# Altium PCB DC-DC_30KW_BUCK-BOOST.PcbDoc (part 1 of 2)
Units mm, origin at the board's own origin, x right, y up, seen from the top; angles counter-clockwise.
Board outline 250 x 400 mm, 4 copper layers (Top Layer 1, Top Layer, Bottom Layer, Bottom Layer 1), stack 0.603 mm thick; 286 components, 138 nets, 777 pads, 13 vias.
Unrouted connection lines stored in the file: 310.
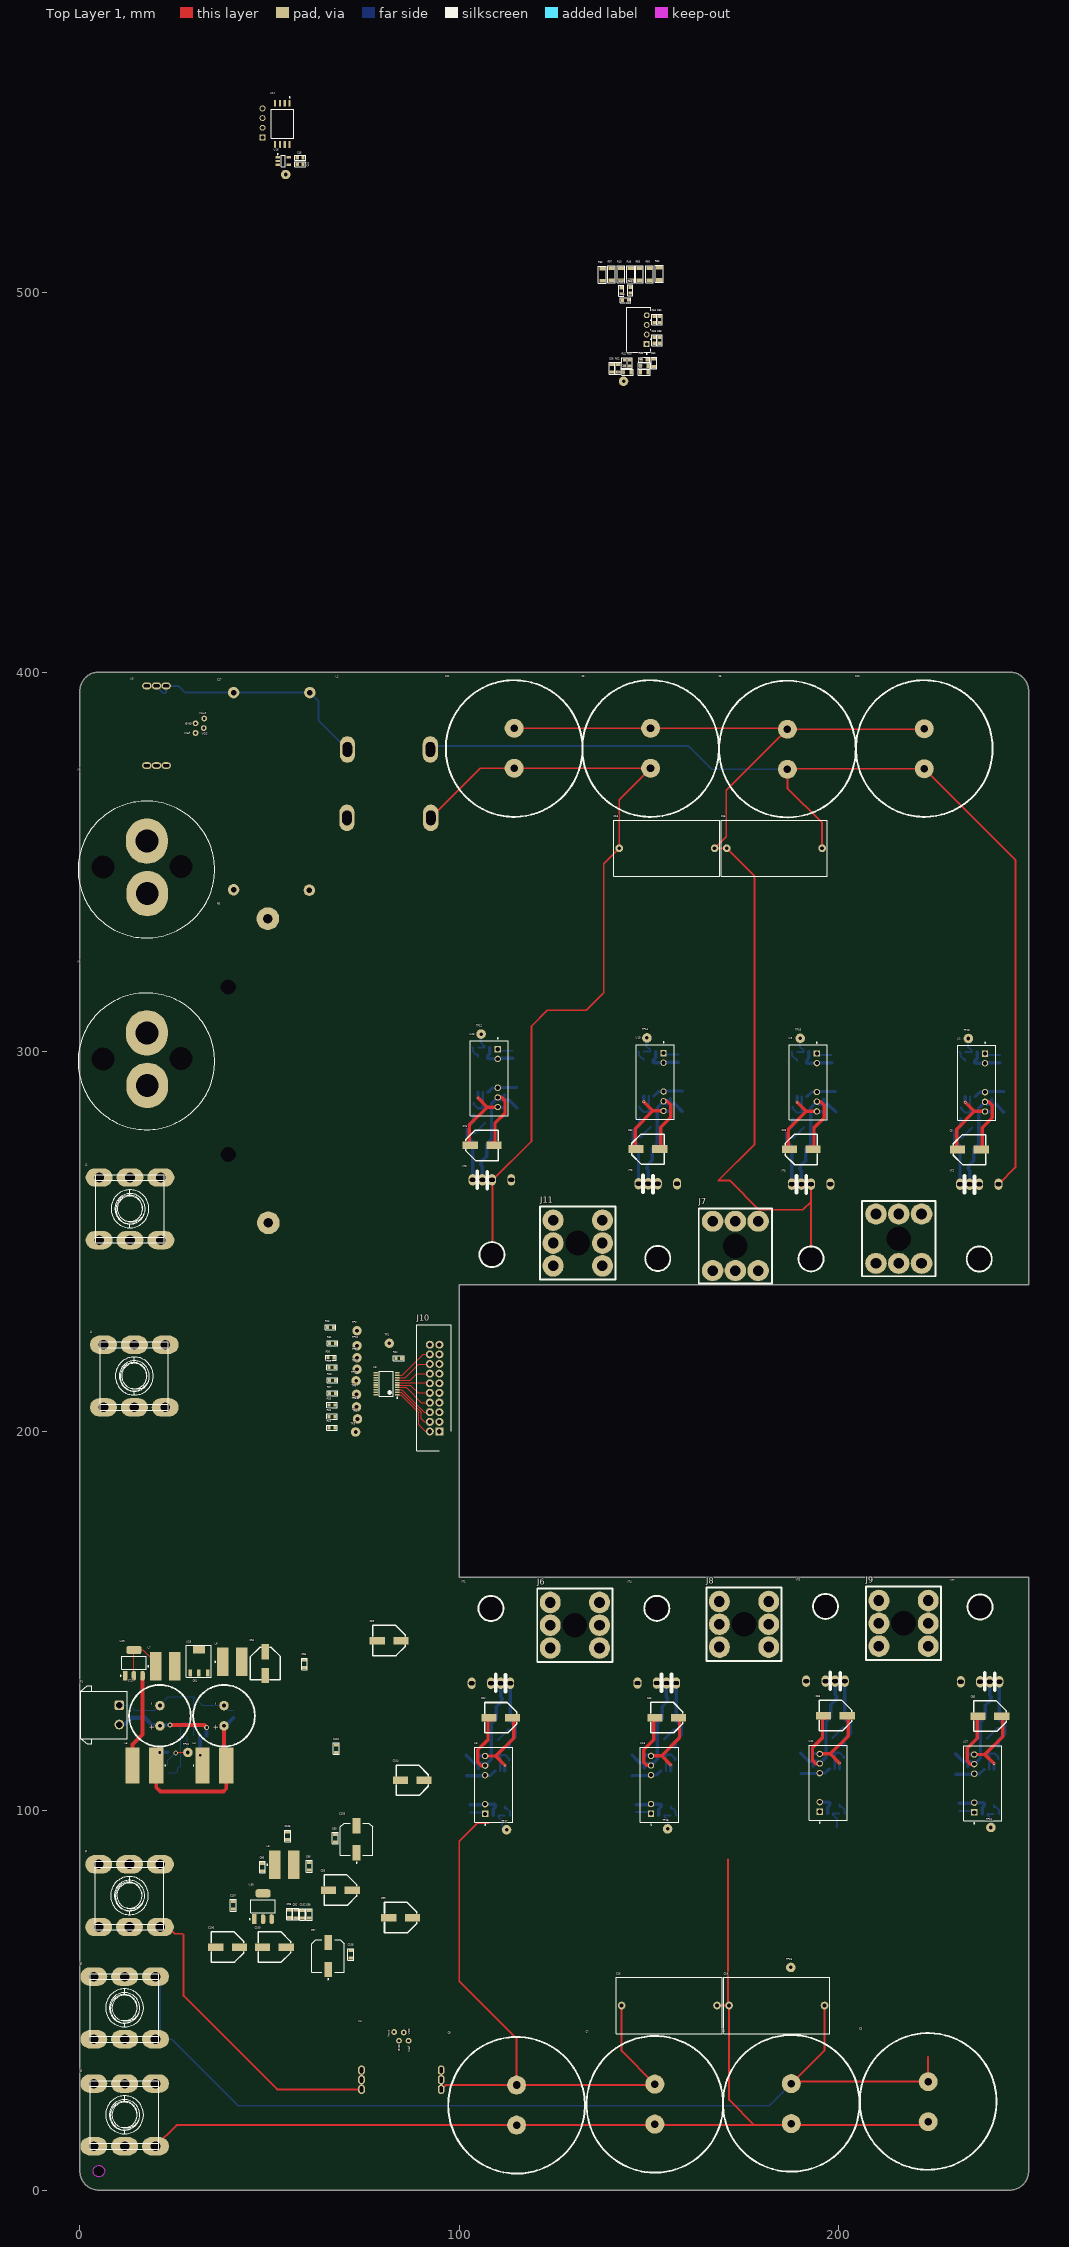
[diagram p0: Top Layer 1 view]
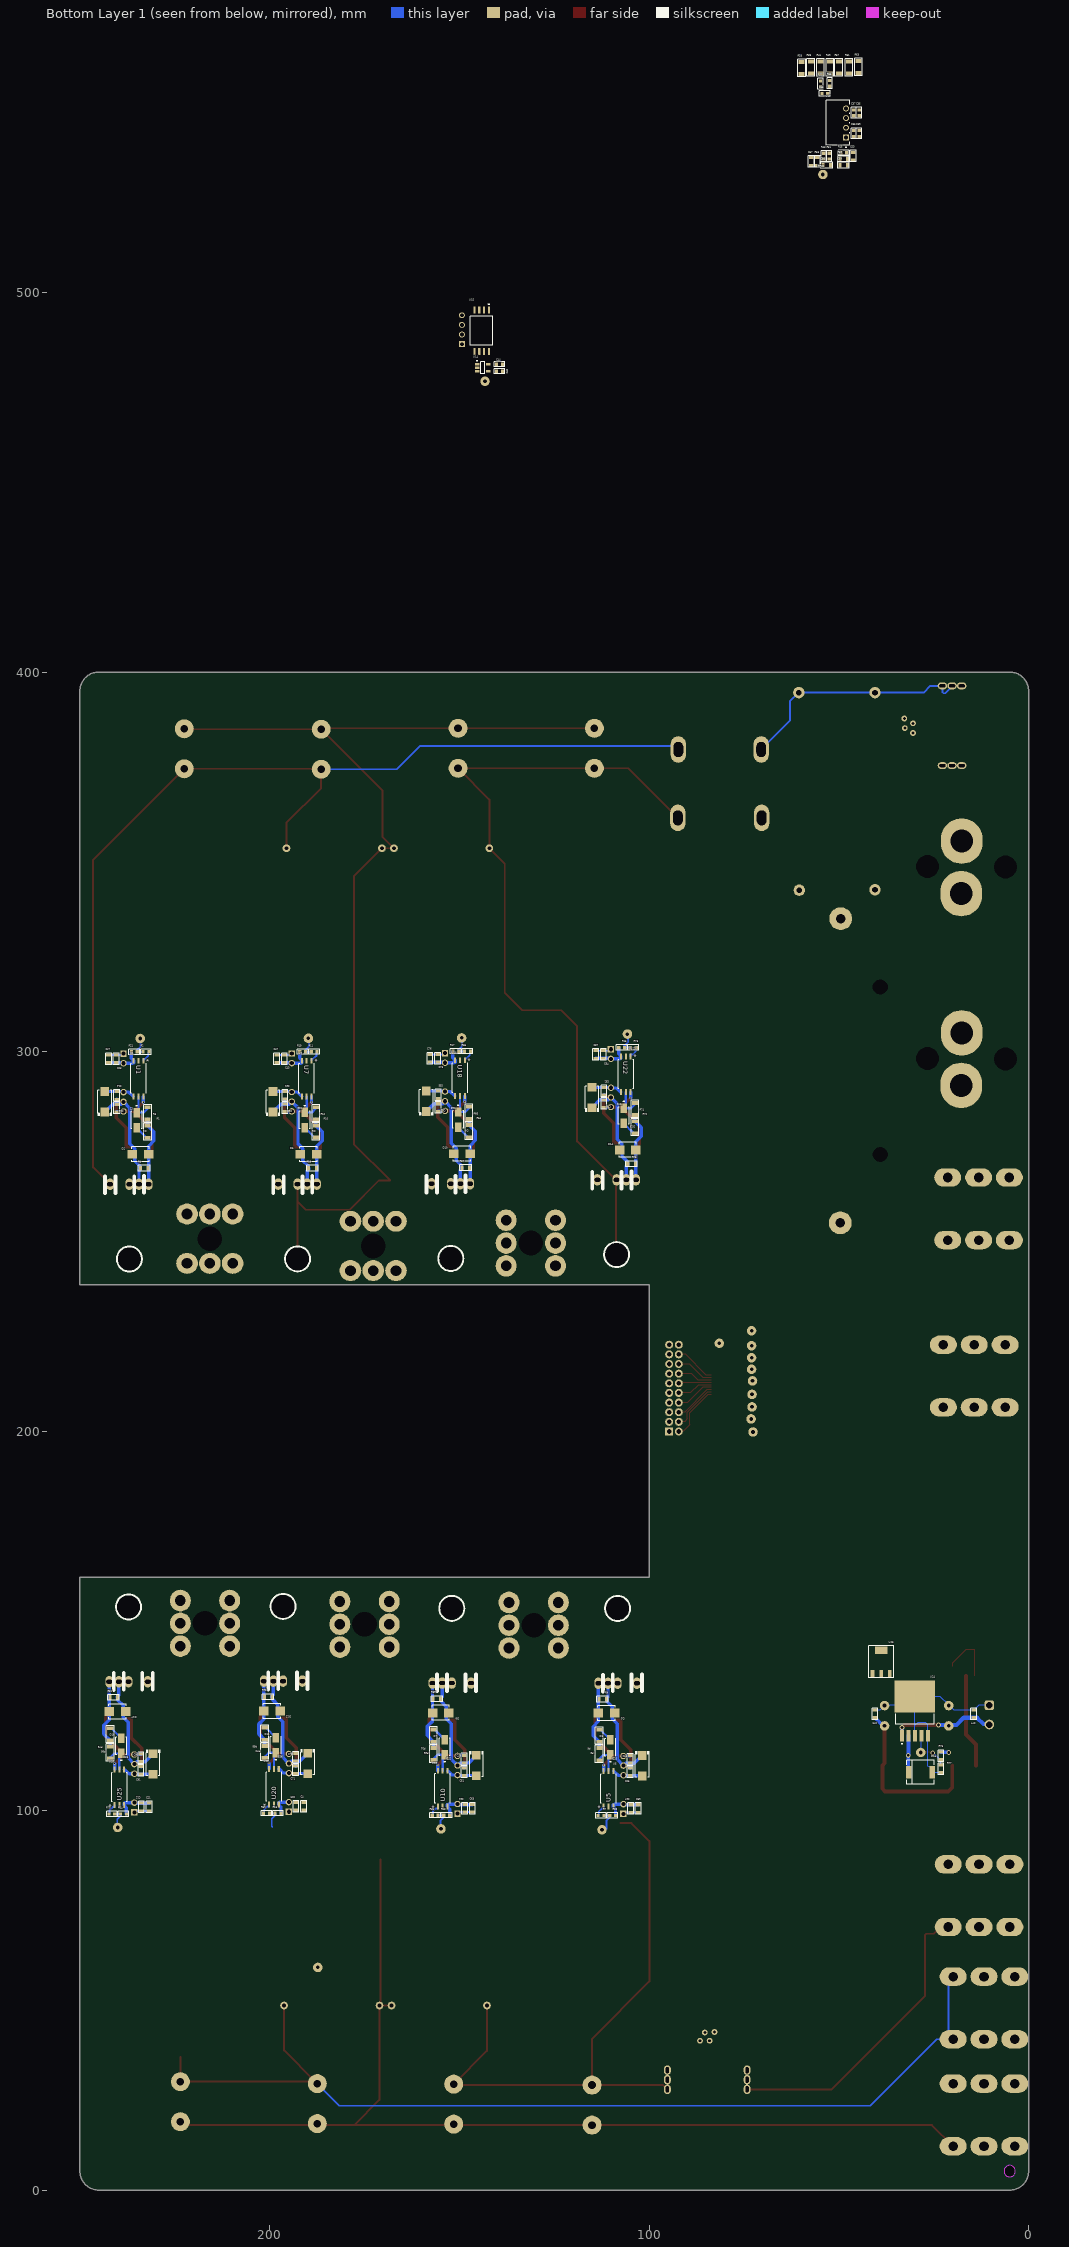
[diagram p1: Bottom Layer 1 view, seen from below]
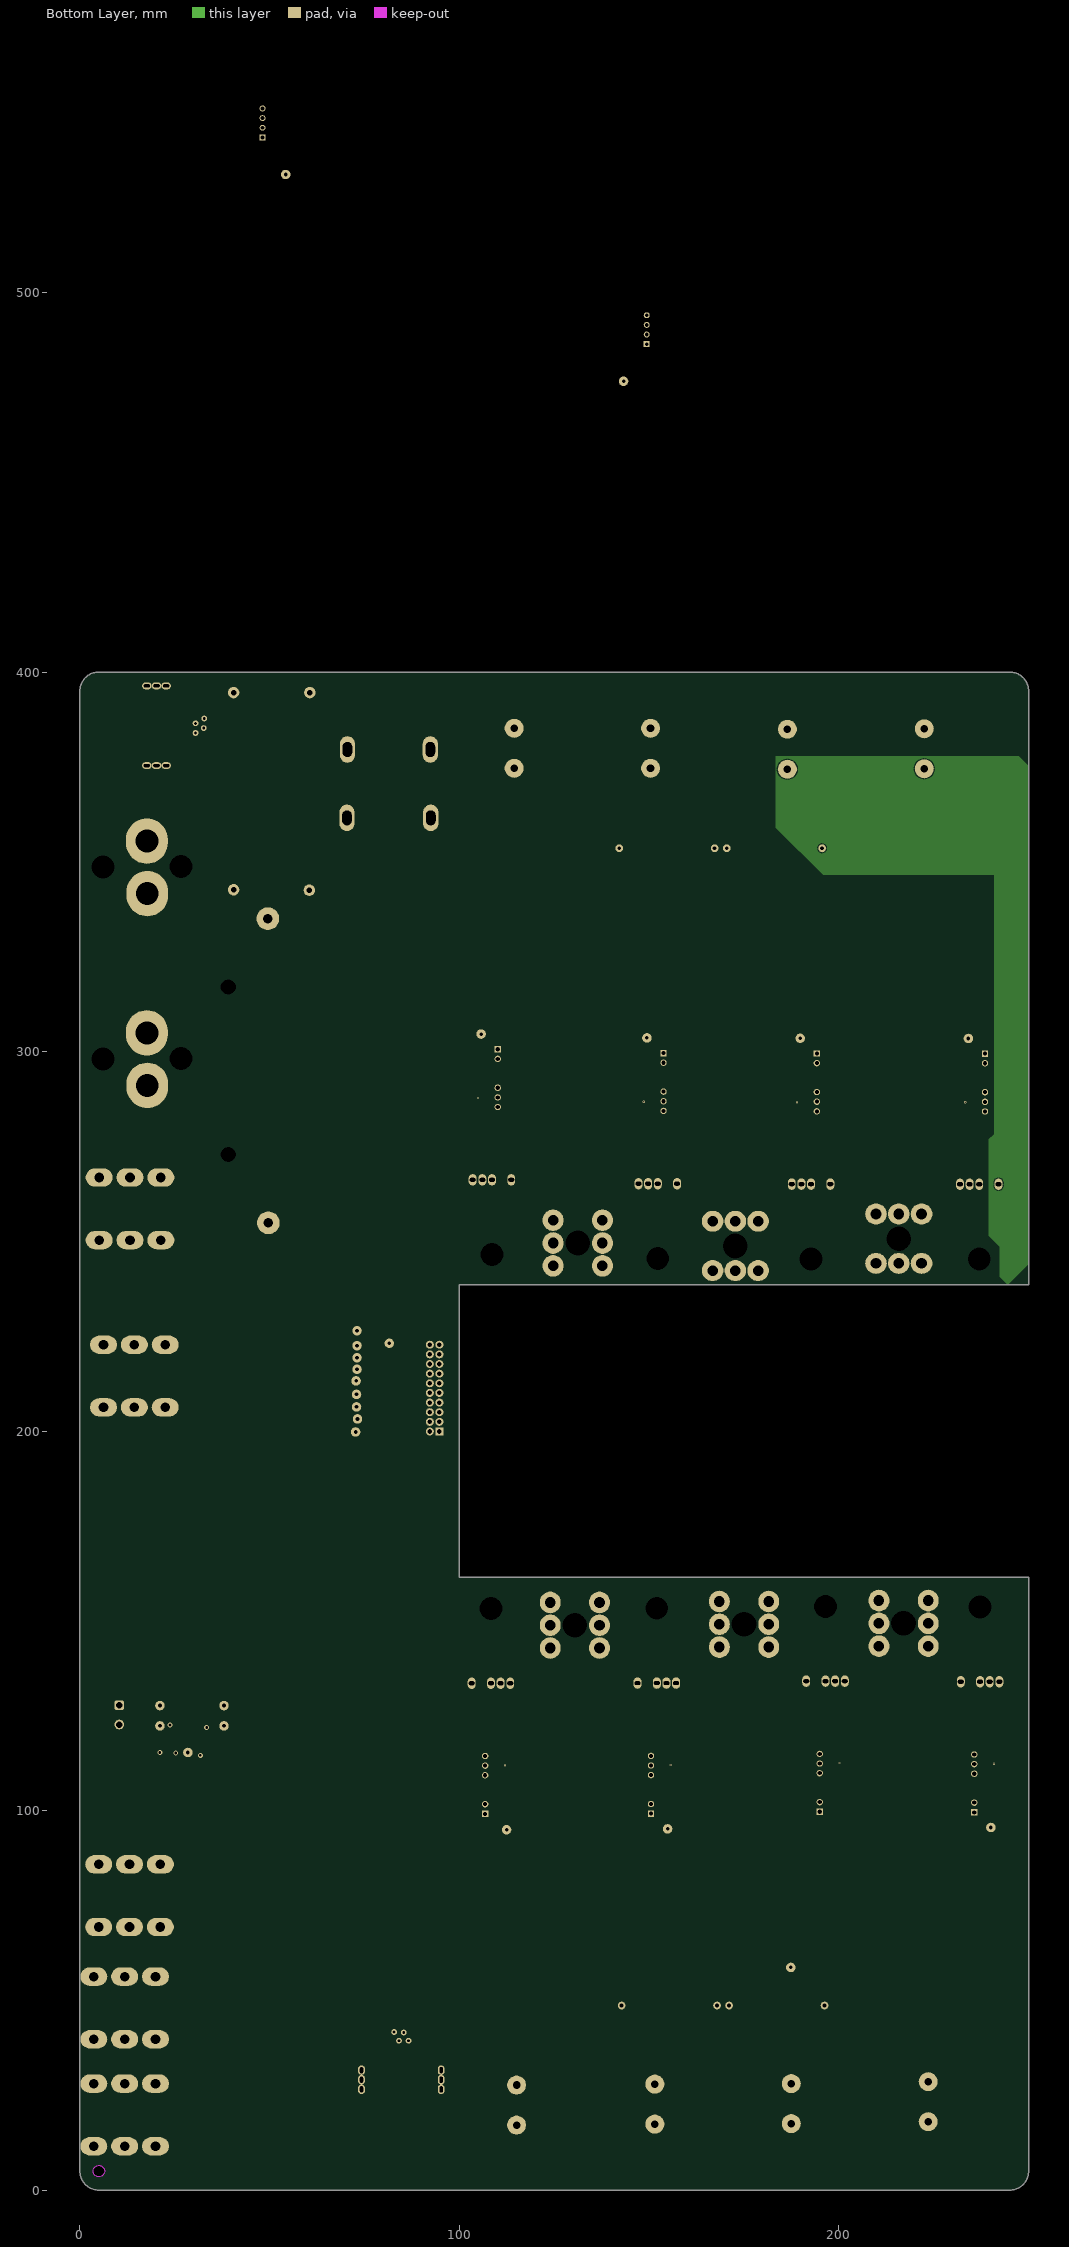
[diagram p2: Bottom Layer]

## Layer stack, top to bottom
Top Solder: solder mask 0.0102, Solder Resist, Dk 3.5
Top Layer 1: signal copper 0.035
Dielectric 2: prepreg 0.0711, PP-006, Dk 4.1
Top Layer: signal copper 0.0356
Dielectric 1: dielectric 0.32, FR-4, Dk 4.8
Bottom Layer: signal copper 0.0356
Dielectric 3: prepreg 0.0711, PP-006, Dk 4.1
Bottom Layer 1: signal copper 0.035
Bottom Solder: solder mask 0.0102, Solder Resist, Dk 3.5

## Board outline
5.006,0.006 cw(c5.006,5.006) 0.006,5.006 0.006,395.006 cw(c5.006,395.006) 5.006,400.006 245.006,400.006 cw(c245.006,395.006) 250.006,395.006 250.006,238.506 100.006,238.506 100.006,161.506 250.006,161.506 250.006,5.006 cw(c245.006,5.006) 245.006,0.006
cut-out: 5.006,3.506 cw(c5.006,5.006) 3.506,5.006 cw(c5.006,5.006) 5.006,6.506 cw(c5.006,5.006) 6.506,5.006 cw(c5.006,5.006)

## Design rules (kind name [scope] priority, off if disabled: settings)
Clearance [All] p1: gap=0.1 ignorepadtopadclearanceinfootprint=FALSE
Height [All] p1: minheight=0 maxheight=60 prefheight=30
PolygonConnect [All] p1: connectstyle=Relief reliefconductorwidth=0.254 reliefentries=4 polygonreliefangle="90 Angle" airgapwidth=0.254
RoutingVias [All] p1: holewidth=0.711 width=1.27 viastyle="Through Hole" minholewidth=0.711 minwidth=1.27 maxholewidth=0.711 maxwidth=1.27
SolderMaskExpansion [All] p1: expansion=0.102 istentingtop=FALSE
SupplyNets "Schematic Supply Nets_9" [InNet('+5V_1')] p1: voltage=0.000
SupplyNets "Schematic Supply Nets_8" [InNet('VCC')] p2: voltage=0.000
SupplyNets "Schematic Supply Nets_7" [InNet('GND')] p3: voltage=0.000
SupplyNets "Schematic Supply Nets_6" [InNet('+5')] p4: voltage=0.000
SupplyNets "Schematic Supply Nets_5" [InNet('+8VDC')] p5: voltage=0.000
SupplyNets "Schematic Supply Nets_4" [InNet('+3V3')] p6: voltage=0.000
SupplyNets "Schematic Supply Nets_3" [InNet('+5V')] p7: voltage=0.000
SupplyNets "Schematic Supply Nets_2" [InNet('+12')] p8: voltage=0.000
SupplyNets "Schematic Supply Nets_1" [InNet('+3V3_MCU')] p9: voltage=0.000
SupplyNets "Schematic Supply Nets" [InNet('+3V3_REF')] p10: voltage=0.000
Width [All] p1: maxlimit=3 minlimit=0.254 preferedwidth=0.5 toplayer_minwidth=0.3 midlayer1_maxwidth=0.254 midlayer1_prefwidth=0.254 midlayer2_maxwidth=0.254 midlayer2_prefwidth=0.254 bottomlayer_minwidth=0.3 minimp=50.000000 maximp=50.000000 favimp=50.000000 checkconnectedcopper=TRUE
29 further rules are at their usual default settings.

## Components (designator, comment, footprint, x,y, rotation, side; value= is the part's Value field where it differs from the comment)
C1 "450V_330uF" 500V_470uF 187.452,22.86 r90 top
C2 "0.1uF" CAP-0805 240.284,285.115 r270 bottom locked
C3 "450V_330uF" 500V_470uF 223.52,23.368 r90 top
C4 "0.01uF" CAP-0805 191.008,101.092 r270 bottom
C5 "450V_330uF" 500V_470uF 186.436,379.73 r90 top
C6 "450V_330uF" 500V_470uF 150.368,379.857 r270 top
C7 "450V_330uF" 500V_470uF 151.511,22.606 r270 top
C8 "450V_330uF" 500V_470uF 115.062,22.352 r270 top
C9 "100uF_50V" CAP_SMD_Size_E 234.442,274.193 r180 top locked
C10 "450V_330uF" 500V_470uF 222.504,379.857 r90 top
C11 "450V_330uF" 500V_470uF 114.427,379.857 r270 top
C12 "2.2uF" CAP-0805 233.766,100.947 r270 bottom
C13 "16V_47uF" CAP-TAN-C 243.459,286.766 r90 bottom locked
C14 "0.1uF" CAP-0805 240.284,288.433 r270 bottom locked
C15 "CAP-NON-POLAR" CAP_4.7uF_630V 183.007,353.568 r0 top
C16 "CAP-NON-POLAR" CAP_4.7uF_630V 155.321,48.641 r180 top
C17 "CAP-NON-POLAR" "Z121578672 77G" 50.546,368.554 r90 top
C18 "CAP-NON-POLAR" CAP_4.7uF_630V 154.686,353.568 r0 top
C19 "CAP-NON-POLAR" CAP_4.7uF_630V 183.642,48.641 r180 top
C20 "0.1uF" CAP-0805 105.016,113.499 r90 bottom
C21 "0.01uF" CAP-0805 231.734,100.947 r270 bottom
C22 "100uF_50V" CAP_SMD_Size_E 110.858,124.421 r0 top
C23 "2.2uF" CAP-0805 240.411,298.069 r90 bottom locked
C24 "16V_47uF" CAP-TAN-C 101.841,111.848 r270 bottom
C25 "0.1uF" CAP-0805 105.015,110.181 r90 bottom
C26 "0.1uF" CAP-0805 195.961,285.148 r270 bottom
C27 "0.01uF" CAP-0805 242.443,298.069 r90 bottom locked
C28 "100uF_50V" CAP_SMD_Size_E 190.119,274.226 r180 top
C29 "2.2uF" CAP-0805 193.04,101.092 r270 bottom
C30 "16V_47uF" CAP-TAN-C 199.136,286.799 r90 bottom
C31 "0.1uF" CAP-0805 195.961,288.466 r270 bottom
C32 "100nF" CAP-0603 152.781,492.887 r90 top
C33 "0.01uF" CAP-0603 151.384,487.426 r90 top
C34 "1uF" CAP-0603 151.384,492.887 r90 top
C35 "100nF" CAP-0603 44.704,547.37 r90 bottom
C36 "0.01uF" CAP-0603 46.101,541.909 r90 bottom
C37 "1uF" CAP-0603 46.101,547.37 r90 bottom
C38 "2.2uF" CAP-0603 152.781,487.426 r90 top
C39 "2.2uF" CAP-0603 44.704,541.909 r90 bottom
C40 "0.01uF" CAP-0603 139.446,479.298 r0 bottom
C41 "0.01uF" CAP-0603 58.039,533.781 r180 top
C42 "0.1uF" CAP-0805 148.717,113.538 r90 bottom
C43 "0.01uF" CAP-0805 196.088,298.102 r90 bottom
C44 "2.2uF" CAP-0603 139.446,481.076 r0 bottom
C45 "2.2uF" CAP-0603 58.039,535.559 r180 top
C46 "100uF_50V" CAP_SMD_Size_E 154.559,124.46 r0 top
C47 "2.2uF" CAP-0805 198.12,298.102 r90 bottom
C48 "1nF" CAP-0805 144.272,479.044 r180 top
C49 "16V_47uF" CAP-TAN-C 145.542,111.887 r270 bottom
C50 "1nF" CAP-0805 53.213,533.527 r0 bottom
C51 "0.1uF" CAP-0805 148.717,110.22 r90 bottom
C52 "10nF" CAP-0805 151.257,481.457 r90 top
C53 "10nF" CAP-0805 46.228,535.94 r90 bottom
C54 "4.7nF" CAP-0603 143.764,497.967 r180 top
C55 "4.7nF" CAP-0603 53.721,552.45 r0 bottom
C56 "470pF" CAP-0805 140.208,480.06 r270 top
C57 "470pF" CAP-0805 57.277,534.543 r270 bottom
C58 "470pF" CAP-0805 148.717,479.044 r0 top
C59 "470pF" CAP-0805 48.768,533.527 r180 bottom
C60 "0.1uF" CAP-0805 155.575,285.257 r270 bottom
C61 "0.01uF" CAP-0805 148.59,100.584 r270 bottom
C62 "100uF_50V" CAP_SMD_Size_E 149.733,274.335 r180 top
C63 "2.2uF" CAP-0805 146.558,100.584 r270 bottom
C64 "16V_47uF" CAP-TAN-C 158.75,286.908 r90 bottom
C65 "0.1uF" CAP-0805 155.575,288.575 r270 bottom
C66 "0.1uF" CAP-0805 193.167,114.046 r90 bottom
C67 "0.01uF" CAP-0805 104.889,100.545 r270 bottom
C68 "100uF_50V" CAP_SMD_Size_E 199.009,124.968 r0 top
C69 "2.2uF" CAP-0805 102.857,100.545 r270 bottom
C70 "16V_47uF" CAP-TAN-C 189.992,112.395 r270 bottom
C71 "0.1uF" CAP-0805 193.167,110.728 r90 bottom
C72 "0.1uF" CAP-0805 111.887,286.273 r270 bottom
C73 "0.01uF" CAP-0805 155.702,298.211 r90 bottom
C74 "25V_1000uF" "HITANO 3300uF 25V  16x25" 21.082,125 r90 top
C75 "100uF_50V" CAP_SMD_Size_E 106.045,275.351 r180 top
C76 "2.2uF" CAP-0805 157.734,298.211 r90 bottom
C77 "1uF" CAP-0805 14.478,125.476 r270 bottom
C78 "16V_47uF" CAP-TAN-C 115.062,287.924 r90 bottom
C79 "0.1uF" CAP-0805 40.513,125.476 r270 bottom
C80 "0.1uF" CAP-0805 67.31,92.726 r90 top
C81 "25V_1000uF" "HITANO 3300uF 25V  16x25" 37.973,125 r90 top
C82 "0.1uF" CAP-0805 111.887,289.591 r270 bottom
C83 "0.1uF" CAP-0805 233.893,113.901 r90 bottom
C84 "0.01uF" CAP-0805 112.014,299.227 r90 bottom
C85 "100uF_50V" CAP_SMD_Size_E 239.735,124.823 r0 top
C86 "0.1uF" CAP-0805 48.133,85.09 r90 top
C87 "2.2uF" CAP-0805 114.046,299.227 r90 bottom
C88 "0.1uF" CAP-0805 60.452,72.644 r90 top
C89 "1000uF 6.3V" CAP_SMD_Size_E 81.407,144.78 r0 top
C90 "16V_47uF" CAP-TAN-C 230.718,112.25 r270 bottom
C91 "0.1uF" CAP-0805 233.893,110.583 r90 bottom
C92 "0.1uF" CAP-0805 56.896,72.755 r90 top
C93 "1000uF 6.3V" CAP_SMD_Size_E 68.58,78.994 r0 top
C94 "1000uF 6.3V" CAP_SMD_Size_E 48.895,138.684 r90 top
C95 "0.1uF" CAP-0805 59.182,138.684 r90 top
C96 "0.1uF" CAP-0805 60.452,85.344 r90 top
C97 "1000uF 10V" CAP_SMD_Size_G 65.405,61.722 r90 top
C98 "0.1uF" CAP-0805 55.245,72.771 r90 top
C99 "1000uF 6.3V" CAP_SMD_Size_E 84.455,71.755 r0 top
C100 "1000uF 6.3V" CAP_SMD_Size_E 51.181,64.008 r0 top
C101 "0.1uF" CAP-0805 67.564,116.332 r90 top
C102 "0.1uF" CAP-0805 58.674,72.644 r90 top
C103 "1000uF 10V" CAP_SMD_Size_G 72.898,92.456 r90 top
C104 "1000uF 6.3V" CAP_SMD_Size_E 87.503,107.95 r0 top
C105 "0.1uF" CAP-0805 54.737,93.345 r90 top
C106 "1000uF 6.3V" CAP_SMD_Size_E 38.862,64.008 r0 top
C107 "0.1uF" CAP-0805 40.386,75.057 r90 top
C108 "0.1uF" CAP-0805 71.374,62.103 r90 top
D1 "US1G" US1G_SMA 235.077,281.94 r270 bottom locked
D2 "SMBJ15CA-TR" FP-SMB-CA-MFG 234.061,272.923 r180 bottom locked
D3 "US1G" US1G_SMA 110.223,116.674 r90 bottom
D4 "SMBJ15CA-TR" FP-SMB-CA-MFG 111.239,125.691 r0 bottom
D5 "US1G" US1G_SMA 190.754,281.973 r270 bottom
D6 "SMBJ15CA-TR" FP-SMB-CA-MFG 189.738,272.956 r180 bottom
D7 "US1G" US1G_SMA 153.924,116.713 r90 bottom
D8 "SMBJ15CA-TR" FP-SMB-CA-MFG 154.94,125.73 r0 bottom
D9 "US1G" US1G_SMA 150.368,282.082 r270 bottom
D10 "SMBJ15CA-TR" FP-SMB-CA-MFG 149.352,273.065 r180 bottom
D11 "US1G" US1G_SMA 198.374,117.221 r90 bottom
D12 "SMBJ15CA-TR" FP-SMB-CA-MFG 199.39,126.238 r0 bottom
D13 "US1G" US1G_SMA 106.68,283.098 r270 bottom
D14 "SMBJ15CA-TR" FP-SMB-CA-MFG 105.664,274.081 r180 bottom
D15 "SS36" SMC/DO214AB 28.505,110.109 r180 bottom
D16 "US1G" US1G_SMA 239.1,117.076 r90 bottom
D17 "SMBJ15CA-TR" FP-SMB-CA-MFG 240.116,126.093 r0 bottom
J1 "18 * 18MM 180A PCB" "M8 Conn" 13.208,258.953 r0 top
J2 "18 * 18MM 180A PCB" "M8 Conn" 13.081,77.978 r0 top
J3 "18 * 18MM 180A PCB" "M8 Conn" 11.786,20.193 r0 top
J4 "18 * 18MM 180A PCB" "M8 Conn" 14.351,214.884 r0 top
J5 "18 * 18MM 180A PCB" "M8 Conn" 11.786,48.387 r0 top
J6 "M5" M5_Conn 130.429,148.844 r0 top
J7 "M5" M5_Conn 172.72,248.793 r90 top
J8 "M5" M5_Conn 175.006,149.098 r0 top
J9 "M5" M5_Conn 217.043,149.352 r0 top
J10 "70246-2001" SHDR20W99P254_2X10_3302X889X947P 94.742,199.898 r90 top
J11 "M5" M5_Conn 131.191,249.555 r0 top
K1 "SEV30ADXL" Relay_1000VDC_30A 18.288,292.354 r0 top
K2 "SEV30ADXL" Relay_1000VDC_30A 18.288,342.9 r0 top
L2 "Drossel" T47x27x15 89.408,370.586 r90 top
L4 "100uH CD105" WE-PD2_1054 35.433,111.887 r0 top
L5 "100uH CD105" WE-PD2_1054 17.018,111.887 r180 top
L6 "220uH CD75" WE-PD2_7850 40.132,139.192 r0 top
L7 "220uH CD75" WE-PD2_7850 22.479,138.049 r0 top
L8 "220uH CD75" WE-PD2_7850 53.848,85.725 r0 top
P1 "691305540002" 691305540002 6.375,125.222 r270 top
R1 "5" RES-1206 232.156,278.892 r270 bottom locked
R2 "150" RES-0603 232.605,299.905 r180 bottom locked
R3 "10" RES-1206 232.156,283.718 r90 bottom locked
R4 "1K" RES-0805 233.045,269.24 r0 bottom locked
R5 "100" RES_100W_Aluminium 49.53,295.021 r90 top
R6 "5" RES-1206 113.144,119.722 r90 bottom
R7 "150" RES-0603 112.695,98.708 r0 bottom
R8 "10" RES-1206 113.144,114.896 r270 bottom
R9 "1K" RES-0805 112.255,129.374 r180 bottom
R10 "5" RES-1206 187.833,278.925 r270 bottom
R11 "150" RES-0603 188.282,299.938 r180 bottom
R12 "10" RES-1206 187.833,283.751 r90 bottom
R13 "1K" RES-0805 188.722,269.273 r0 bottom
R14 "10K" RES-0603 238.524,99.11 r0 bottom
R15 "10K" RES-0603 107.256,301.063 r180 bottom
R16 "10K" RES-0603 197.798,99.256 r0 bottom
R17 "10K" RES-0603 150.944,300.047 r180 bottom
R18 "10K" RES-0603 153.348,98.748 r0 bottom
R19 "10K" RES-0603 191.33,299.938 r180 bottom
R20 "10K" RES-0603 109.647,98.708 r0 bottom
R21 "10K" RES-0603 235.653,299.905 r180 bottom locked
R22 "10K" RES-0603 84.061,219.202 r180 top
R23 "10K" RES-0603 66.04,227.33 r0 top
R24 "10K" RES-0603 66.434,200.914 r0 top
R25 "10K" RES-0603 66.421,203.835 r0 top
R26 "10K" RES-0603 66.421,206.883 r0 top
R27 "10K" RES-0603 66.548,209.931 r0 top
R28 "10K" RES-0603 66.548,213.36 r0 top
R29 "10K" RES-0603 66.421,216.789 r0 top
R30 "10K" RES-0603 66.167,219.329 r0 top
R31 "10K" RES-0603 66.548,223.139 r0 top
R32 "200K" RES-1206 137.668,504.698 r90 top
R33 "200K" RES-1206 59.817,559.181 r90 bottom
R34 "5" RES-1206 156.845,119.761 r90 bottom
R35 "150" RES-0603 156.396,98.748 r0 bottom
R36 "10" RES-1206 156.845,114.935 r270 bottom
R37 "200K" RES-1206 140.081,504.825 r90 top
R38 "200K" RES-1206 57.404,559.308 r90 bottom
R39 "1K" RES-0805 155.956,129.413 r180 bottom
R40 "200K" RES-1206 142.621,504.825 r90 top
R41 "200K" RES-1206 54.864,559.308 r90 bottom
R42 "10K" RES-0603 143.51,481.457 r90 top
R43 "10K" RES-0603 53.975,535.94 r90 bottom
R44 "100" RES-0603 148.717,482.346 r180 top
R45 "100" RES-0603 48.768,536.829 r0 bottom
R46 "100" RES-0603 142.621,500.507 r90 top
R47 "100" RES-0603 54.864,554.99 r90 bottom
R48 "2.4K" RES-1206 145.161,504.825 r90 top
R49 "2.4K" RES-1206 52.324,559.308 r90 bottom
R50 "10K" RES-0603 144.907,481.457 r90 top
R51 "10K" RES-0603 52.578,535.94 r90 bottom
R52 "10K" RES-0805 141.859,480.06 r270 top
R53 "10K" RES-0805 55.626,534.543 r270 bottom
R54 "100" RES-0603 145.034,500.634 r90 top
R55 "100" RES-0603 52.451,555.117 r90 bottom
R56 "200K" RES-1206 147.447,504.825 r90 top
R57 "200K" RES-1206 50.038,559.308 r90 bottom
R58 "10K" RES-0805 148.717,480.695 r0 top
R59 "10K" RES-0805 48.768,535.178 r180 bottom
R60 "200K" RES-1206 150.114,504.825 r90 top
R61 "200K" RES-1206 47.371,559.308 r90 bottom
R62 "200K" RES-1206 152.654,504.952 r90 top
R63 "200K" RES-1206 44.831,559.435 r90 bottom
R64 "5" RES-1206 147.447,279.034 r270 bottom
R65 "150" RES-0603 147.896,300.047 r180 bottom
R66 "10" RES-1206 147.447,283.86 r90 bottom
R67 "1K" RES-0805 148.336,269.382 r0 bottom
R68 "5" RES-1206 201.295,120.269 r90 bottom
R69 "150" RES-0603 200.846,99.256 r0 bottom
R70 "10" RES-1206 201.295,115.443 r270 bottom
R71 "1K" RES-0805 200.406,129.921 r180 bottom
R72 "5" RES-1206 103.759,280.05 r270 bottom
R73 "150" RES-0603 104.208,301.063 r180 bottom
R74 "10" RES-1206 103.759,284.876 r90 bottom
R75 "1K" RES-0805 104.648,270.398 r0 bottom
R76 "11K" RES-0805 23.114,114.427 r90 bottom
R77 "2K" RES-0805 23.114,110.998 r90 bottom
R78 "5" RES-1206 242.021,120.124 r90 bottom
R79 "150" RES-0603 241.572,99.11 r0 bottom
R80 "10" RES-1206 242.021,115.298 r270 bottom
R81 "1K" RES-0805 241.132,129.776 r180 bottom
TP1 "Test_Point_PCB" Test_Point 81.534,223.139 r0 top
TP2 "Test_Point_PCB" Test_Point 73.025,226.441 r0 top
TP3 "Test_Point_PCB" Test_Point 72.644,199.771 r0 top
TP4 "Test_Point_PCB" Test_Point 73.152,203.2 r0 top
TP5 "Test_Point_PCB" Test_Point 72.898,206.375 r0 top
TP6 "Test_Point_PCB" Test_Point 72.898,209.677 r0 top
TP7 "Test_Point_PCB" Test_Point 72.771,213.233 r0 top
TP8 "Test_Point_PCB" Test_Point 73.025,216.281 r0 top
TP9 "Test_Point_PCB" Test_Point 73.025,219.329 r0 top
TP10 "Test_Point_PCB" Test_Point 73.025,222.504 r90 top
TP11 "Test_Point_PCB" Test_Point 240.048,95.554 r270 top
TP12 "Test_Point_PCB" Test_Point 105.732,304.619 r90 top
TP13 "Test_Point_PCB" Test_Point 187.325,58.674 r270 top
TP14 "Test_Point_PCB" Test_Point 149.42,303.603 r90 top
TP15 "Test_Point_PCB" Test_Point 154.872,95.192 r270 top
TP16 "Test_Point_PCB" Test_Point 189.806,303.494 r90 top
TP17 "Test_Point_PCB" Test_Point 112.441,94.949 r270 top
TP18 "Test_Point_PCB" Test_Point 234.129,303.461 r90 top locked
TP19 "Test_Point_PCB" Test_Point 143.256,476.631 r90 top
TP20 "Test_Point_PCB" Test_Point 54.229,531.114 r90 bottom
TP21 "" Test_Point 28.448,115.316 r90 top
U1 "TLP5754" SO6L_TOS 234.569,292.862 r270 bottom locked
U2 "MGJ2D121505SC" FP-MGJ2D121505SC-MFG 236.276,291.846 r270 top locked
U3 "STK-PL50A" STK-PL50A 20.193,385.867 r0 top
U4 "STK-PL50A" STK-PL50A 84.709,29.083 r90 top
U5 "TLP5754" SO6L_TOS 110.731,105.752 r90 bottom
U6 "MGJ2D121505SC" FP-MGJ2D121505SC-MFG 109.024,106.768 r90 top
U7 "TLP5754" SO6L_TOS 190.246,292.895 r270 bottom
U8 "SN74LVC541APWR" PW0020A_L 80.772,212.471 r180 top
U9 "MGJ2D121505SC" FP-MGJ2D121505SC-MFG 191.953,291.879 r270 top
U10 "TLP5754" SO6L_TOS 154.432,105.791 r90 bottom
U11 "B0505S-1W" B0505S-1W 147.252,490.22 r90 top
U12 "B0505S-1W" B0505S-1W 50.233,544.703 r90 bottom
U13 "MGJ2D121505SC" FP-MGJ2D121505SC-MFG 152.725,106.807 r90 top
U14 "OPA320AIDBVT" DBV0005A_M 143.891,480.187 r180 bottom
U15 "AMC1311B" FP-DWV0008A-MFG 144.145,489.966 r270 bottom
U16 "OPA320AIDBVT" DBV0005A_M 53.594,534.67 r0 top
U17 "AMC1311B" FP-DWV0008A-MFG 53.34,544.449 r270 top
U18 "TLP5754" SO6L_TOS 149.86,293.004 r270 bottom
U19 "MGJ2D121505SC" FP-MGJ2D121505SC-MFG 151.567,291.988 r270 top
U20 "TLP5754" SO6L_TOS 198.882,106.299 r90 bottom
U21 "MGJ2D121505SC" FP-MGJ2D121505SC-MFG 197.175,107.315 r90 top
U22 "TLP5754" SO6L_TOS 106.172,294.02 r270 bottom
U23 "MGJ2D121505SC" FP-MGJ2D121505SC-MFG 107.879,293.004 r270 top
U24 "LM2576HVS-ADJ" ON_Semiconductor_936A-02_MFG 29.972,126.238 r180 bottom
U25 "TLP5754" SO6L_TOS 239.608,106.154 r90 bottom
U26 "AMS1117-3v3" SOT-223-3 38.862,139.192 r180 bottom
U27 "MGJ2D121505SC" FP-MGJ2D121505SC-MFG 237.901,107.17 r90 top
U28 "AMS1117-3v3" SOT-223-3 31.369,139.319 r0 top
U29 "AMS1117-5V1" SOT-223 14.224,138.938 r0 top
U30 "AMS1117-5V1" SOT-223 48.26,74.803 r0 top
VT1 "C3M0022120K" TO247-4-BEND-SHORT 108.318,153.265 r0 top
VT2 "C3M0022120K" TO247-4-BEND-SHORT 236.982,245.349 r180 top locked
VT3 "C3M0022120K" TO247-4-BEND-SHORT 192.659,245.382 r180 top
VT4 "C3M0022120K" TO247-4-BEND-SHORT 152.019,153.304 r0 top
VT5 "C3M0022120K" TO247-4-BEND-SHORT 196.469,153.812 r0 top
VT6 "C3M0022120K" TO247-4-BEND-SHORT 152.273,245.491 r180 top
VT7 "C3M0022120K" TO247-4-BEND-SHORT 237.195,153.667 r0 top
VT8 "C3M0022120K" TO247-4-BEND-SHORT 108.585,246.507 r180 top
? "M5" M5_Conn 215.773,250.698 r90 top

## Footprints (in the part's own frame and the unit in brackets; to place one, negate y for a bottom-side part, rotate by r counter-clockwise, add the part's x,y. Pads: shape width x height; smd on the part's side, far side on the other; paste and mask are expansions set on the pad)
500V_470uF [mm]
  round 5 hole 2: 1(-5.334,0) 2(5.207,0)
  silkscreen extent -18,-18 18,18, body extent -17.6,-17.6 17.61,17.61, height 59.97
691305540002 [mm] "5,08mm - PCB Header Horizontal Entry with Plastic Latches - 02p"
  rrect50% 2.55x2.55 hole 1.7: 1(-2.54,4)
  round 2.55 hole 1.7: 2(2.54,4)
  silkscreen extent -7.65,-6.15 7.65,6.15, body extent -7.48,-6 7.48,6, height 8.63
B0505S-1W [mm]
  rect 1.55x1.55 hole 1 paste-2539.97 mask+0: 1(-3.81,-2.1)
  round 1.55 hole 1 paste-2539.97 mask+0: 2(-1.27,-2.1) 3(1.27,-2.1) 4(3.81,-2.1)
  silkscreen extent -6.52,-3.13 5.92,3.13, body extent -6.02,-3.22 6.02,3.22, height 0.25
CAP-0603 [mm]
  rect 0.85x0.9 smd: 1(-0.775,0) 2(0.775,0)
  silkscreen extent -1.43,-0.67 1.43,0.67, body extent -0.8,-0.4 0.8,0.4, height 0.8
CAP-0805 [mm]
  rect 0.8x1.25 smd mask+0.015: 1(-1,0) 2(1,0)
  silkscreen extent -1.52,-0.76 1.52,0.76, body extent -1,-0.62 1,0.63, height 0.8
CAP-TAN-C [mm]
  rect 2.3x2.3 smd: 1(-2.7,0) 2(2.7,0)
  silkscreen extent -3.8,-1.9 3,1.9, body extent -2.9,-1.6 2.9,1.6, height 2.6
CAP_4.7uF_630V [mil]
  round 80 hole 40: 1(-495,0) 2(495,0)
  silkscreen extent -550,-292 550,292, body extent -527,-289 527,289, height 1242
CAP_SMD_Size_E [mm]
  rect 4x2 smd: 1(3.175,0) 2(-3.048,0)
  silkscreen extent -4.19,-3.94 4.32,4.06, body extent -4.25,-4 4.25,4, height 10.59
CAP_SMD_Size_G [mm]
  rect 4x2 smd paste+0 mask+0: 1(3.55,0) 2(-3.55,0)
  silkscreen extent -6.27,-4.25 4.25,4.25, body extent -5.8,-4.5 5.8,4.5, height 0.25
DBV0005A_M [mm] "SOT23, 5-Leads, Body 3.05x1.75mm, Pitch 0.95mm, IPC Low Density"
  rrect15% 1.2x0.65 smd: 1(-1.475,0.95) 2(-1.475,0) 3(-1.475,-0.95) 4(1.475,-0.95) 5(1.475,0.95)
  silkscreen extent -1.6,-1.55 0.5,1.95, body extent -1.42,-1.46 1.42,1.46, height 1.08
FP-DWV0008A-MFG [mm]
  rect 1.8x0.6 smd paste+0 mask+0: 1(-5.45,1.905) 2(-5.45,0.635) 3(-5.45,-0.635) 4(-5.45,-1.905) 5(5.45,-1.905) 6(5.45,-0.635) 7(5.45,0.635) 8(5.45,1.905)
  silkscreen extent -7.1,-2.98 3.8,2.98, body extent -5.75,-2.93 5.75,2.93, height 2.8
FP-MGJ2D121505SC-MFG [mm]
  rect 1.675x1.675 hole 1.075 paste-2539.97 mask+0: 1(-7.62,2.23)
  round 1.675 hole 1.075 paste-2539.97 mask+0: 2(-5.08,2.23) 5(2.54,2.23) 6(5.08,2.23) 7(7.62,2.23)
  silkscreen extent -10.6,-5.02 9.87,5.02, body extent -9.97,-5.13 9.97,5.13, height 0.25
FP-SMB-CA-MFG [mm]
  rect 2.5x2.3 smd paste+0 mask+0: 1(-2.15,0) 2(2.15,0)
  silkscreen extent -2.28,-1.97 2.28,1.97, body extent -2.65,-1.81 2.65,1.81, height 2.5
"HITANO 3300uF 25V  16x25" [mm]
  round 2.5 hole 1: 1(-2.667,0) 2(2.667,0)
  silkscreen extent -8.12,-8.12 8.12,8.12, body extent -8.15,-8.14 8.16,8.16, height 25.87
M5_Conn [mm]
  round 1.524 hole 6.5: 0(0,0)
  oval 5.5x5.7 hole 2.8: 1(-6.5,-6) 1(-6.5,0) 1(-6.5,6) 1(6.5,-6) 1(6.5,0) 1(6.5,6)
  silkscreen extent -9.91,-9.65 9.91,9.65, body extent -7.25,-7.1 7.25,7.1, height 5.5
"M8 Conn" [mil] "M8 Conn"
  oval 280x190 hole 100: 1(-320,-340) 1(-320,310) 1(0,-340) 1(0,310) 1(320,-340) 1(320,310)
  silkscreen extent -355,-369 354,340, body extent -355,-369 354,340, height 500
ON_Semiconductor_936A-02_MFG [mm]
  rect 1.016x3.05 smd paste+0 mask+0: 1(-3.404,-6.485) 2(-1.702,-6.485) 3(0,-6.485) 4(1.702,-6.485) 5(3.404,-6.485)
  rect 10.66x8.38 smd paste+0 mask+0: 6(0,3.82)
  silkscreen extent -5.12,-8.72 5.12,-0.75, body extent -5.01,-7.11 5.01,7.14, height 4.83
PW0020A_L [mm] "SOP, 20-Leads, Body 6.6x4.5mm, Pitch 0.65mm, IPC High Density"
  rrect25% 1.2x0.4 smd: 1(-2.85,2.925) 2(-2.85,2.275) 3(-2.85,1.625) 4(-2.85,0.975) 5(-2.85,0.325) 6(-2.85,-0.325) 7(-2.85,-0.975) 8(-2.85,-1.625) 9(-2.85,-2.275) 10(-2.85,-2.925) 11(2.85,-2.925) 12(2.85,-2.275) 13(2.85,-1.625) 14(2.85,-0.975) 15(2.85,-0.325) 16(2.85,0.325) 17(2.85,0.975) 18(2.85,1.625) 19(2.85,2.275) 20(2.85,2.925)
  silkscreen extent -2.98,-3.3 1.85,3.8, body extent -3.21,-3.25 3.21,3.25, height 1
Relay_1000VDC_30A [mm] "Relay_1000VDC_30A"
  round 4 hole 6: 0(-12.192,5.715) 0(8.382,5.842)
  oval 11x12 hole 6: 1(-0.635,12.573) 2(-0.508,-1.27)
  silkscreen extent -18.76,-12.92 17.24,23.08, body extent -17.24,-19.09 16.26,30.52, height 52
RES-0603 [mm]
  rect 0.85x0.9 smd: 1(-0.775,0) 2(0.775,0)
  silkscreen extent -1.43,-0.67 1.43,0.67, body extent -0.85,-0.45 0.85,0.45, height 0.55
RES-0805 [mm]
  rect 0.8x1.25 smd mask+0.015: 1(-1,0) 2(1,0)
  silkscreen extent -1.52,-0.76 1.52,0.76, body extent -1,-0.62 1,0.63, height 0.6
RES-1206 [mm]
  rect 1x1.6 smd: 1(-1.6,0) 2(1.6,0)
  silkscreen extent -2.29,-1.02 2.29,1.02, body extent -1.6,-0.8 1.6,0.8, height 0.6
RES_100W_Aluminium [mm]
  round 3 hole 4: 0(-22.098,10.414) 0(21.971,10.414)
  round 6 hole 2.5: 1(-40.132,-0.127) 2(40.005,0)
  body extent -43.07,-7.58 42.93,13.42, height 15.36
SHDR20W99P254_2X10_3302X889X947P [mm]
  rect 2.1x2.1 hole 1.2: 1(0,0)
  round 2.1 hole 1.2: 2(0,2.54) 3(2.54,0) 4(2.54,2.54) 5(5.08,0) 6(5.08,2.54) 7(7.62,0) 8(7.62,2.54) 9(10.16,0) 10(10.16,2.54) 11(12.7,0) 12(12.7,2.54) 13(15.24,0) 14(15.24,2.54) 15(17.78,0) 16(17.78,2.54) 17(20.32,0) 18(20.32,2.54) 19(22.86,0) 20(22.86,2.54)
  silkscreen extent -5.08,-3.17 28.14,5.91, body extent -5.08,-3.18 27.94,5.72, height 9.55
SMC/DO214AB [mm]
  rect 1.52x3.2 smd: 1(-3.105,0) 2(3.105,0)
  silkscreen extent -3.6,-3.15 3.6,3.15, body extent -3.77,-3.11 3.77,3.11, height 2.62
SO6L_TOS [mil] "SO6L_TOS"
  rect 60x21 smd paste+0 mask+0: 1(-185,50) 2(-185,0) 3(-185,-50) 4(185,-50) 5(185,0) 6(185,50)
  silkscreen extent -153,-81 153,81, body extent -201,-76 201,76, height 87
SOT-223 [mm]
  rect 1.2x2.6 smd paste+0 mask+0: 1(-2.29,-3.395)
  rrect100% 1.2x2.6 smd paste+0 mask+0: 2(0,-3.395) 3(2.29,-3.395)
  rrect59% 4x2.2 smd paste+0 mask+0: 2(0,3.395)
  silkscreen extent -3.62,-3.52 3.25,1.75, body extent -3.75,-4.7 3.75,4.7, height 0.25
SOT-223-3 [mm]
  rect 0.95x1.9 smd: 1(-2.3,-3.05) 2(0,-3.05) 3(2.3,-3.05)
  rect 3.25x1.9 smd: 2(0,3.05)
  silkscreen extent -3.3,-4.2 3.3,4.2, body extent -3.25,-3.5 3.25,3.5, height 1.7
STK-PL50A [mm] "STK-PL50A"
  round 1.524 hole 0.762: 1(10.287,-1.905) 2(12.573,1.905) 3(10.287,0.635) 4(12.446,-0.635)
  oval 2.5x1.8 hole 0.8 slot 1.6 at 0 deg: 5(2.54,10.5) 6(0,10.5) 7(-2.54,10.5) 8(-2.54,-10.5) 9(0,-10.5) 10(2.54,-10.5)
  body extent -7.07,-10.77 14.53,10.83, height 14.8
T47x27x15 [mm] "T47x27x15"
  oval 7x4 hole 2.5 slot 3.9 at 0 deg: 1(-9.017,19.05) 2(-9.017,-3.048) 3(9.017,18.923) 4(9.017,-2.921)
  body extent -27.5,-7.07 27.31,22.07, height 50.02
Test_Point [mm]
  round 2.5 hole 0.95: 1(0,0)
TO247-4-BEND-SHORT [mm]
  oval 2.1x3 hole 1 slot 1.5 at 0 deg: 1(-5.08,-19.7) 2(0,-19.7) 3(2.54,-19.7) 4(5.08,-19.7)
  round 5 hole 6: 2(0,0)
  silkscreen extent -3.3,-21.89 3.86,3.3, body extent -7.9,-20.05 7.9,6.15, height 4.04
US1G_SMA [mm]
  rect 2.5x1.7 smd paste+0 mask+0: 1(-2,0) 2(2,0)
  silkscreen extent -3.92,-1.46 2.3,1.46, body extent -2.6,-1.3 2.6,1.3, height 2.4
WE-PD2_1054 [mm] "SMD Power Inductor, 2-Leads, body 10x9mm"
  rect 3.75x9.5 smd: 1(-3.125,0) 2(3.125,0)
  silkscreen extent -5.62,-0.12 -5.37,0.12, body extent -5.04,-4.5 5.04,4.5, height 5.43
WE-PD2_7850 [mm] "SMD Power Inductor, 2-Leads, body 7.8x7mm"
  rect 3x7.5 smd: 1(-2.5,0) 2(2.5,0)
  silkscreen extent -4.59,-0.12 -4.34,0.12, body extent -3.81,-3.5 3.81,3.5, height 4.95
"Z121578672 77G" [mm] "Z121578672 77G"
  round 3 hole 1.5: 1(-26.035,-9.906) 1(-25.908,10.033) 2(26.035,-10.033) 2(26.035,10.033)
  body extent -28.5,-14.5 28.5,14.5, height 47.01

## Part data
C1 C3 C5 C6 C7 C8 C10 C11: library part CAP_POL_LOW_IMP
C2 C14 C20 C25 C26 C31 C42 C51 C60 C65 C66 C71 C72 C82 C83 C91: library part CAP-NON-POLAR, "0.1uF X7R"
C4 C21 C27 C43 C61 C67 C73 C84: library part CAP-NON-POLAR, "0.01uF X7R"
C9 C13 C22 C24 C28 C30 C46 C49 C62 C64 C68 C70 C75 C78 C85 C90: library part CAP_POL_SMD
C12 C23 C29 C32 C33 C34 C35 C36 C37 C38 C39 C40 C41 C44 C45 C47 C48 C50 C52 C53 C54 C55 C56 C57 C58 C59 C63 C69 C76 C77 C79 C80 C86 C87 C88 C92 C95 C96 C98 C101 C102 C105 C107 C108: library part CAP-NON-POLAR
C74 C81 C89 C93 C94 C97 C99 C100 C103 C104 C106: library part CAP-POLAR
D15: library part SS36_Schottky
J1 J2 J3 J4 J5: library part Klema_15_A, "18 * 18MM 180A PCB High Current Solder Terminal Copper Terminal Fastener M8 Nut"
J6 J7 J8 J9 J11 ?: library part Klema_15_A
J10: "Headers & Wire Housings 20CKT SHRD HDR", Manufacturer_Name=Molex, Mouser Part Number=538-70246-2001, Datasheet Link=https://componentsearchengine.com/Datasheets/2/70246-2001.pdf, Geometry.Height=9.47mm, Manufacturer_Part_Number=70246-2001, Mouser Price/Stock=https://www.mouser.co.uk/ProductDetail/Molex/70246-2001?qs=L7RdmAxh%252BcMgmUPcB5dMoQ%3D%3D
K1 K2: library part Relay, "5-1000V 30A DC Contactor Power Relay SEV30ADXL Coil 12V"
L2: library part Drossel_Synphaze
L4 L5: library part 744776122, Case/Size Code=1054, DC Resistance=0.051Ω, DC Resistance Max=0.1Ω, Inductance=22µH, Manufacturer="Wurth Elektronik", Operating Temperature Max=125°C, Operating Temperature Min=-40°C, Rated Current=2.04A, Saturation Current=2.07A, Self Resonant Frequency=16MHz, Category="Unshielded Power Inductors", ComponentLink1Description="Website Link", ComponentLink1URL=https://www.we-online.com/redexpert/article/744776122?ad, ComponentLink2Description="Datasheet Link", ComponentLink2URL=https://www.we-online.com/redexpert/spec/744776122?ad, Height=5.4mm, Length=10mm, Manufacturer Part Number=744776122, Match Code=WE-PD2, Mount="Surface Mount", Packaging="Tape and Reel", Width=9mm, Simulation ModelName=1054_744776122_22u, Simulation ModelText=".subckt 1054_744776122_22u 1 2 / Rp 1 2 22000 / Cp 1 2 4.3p / Rs 1 N3 0.0511 / L1 N3 2 22u / .ends 1054_744776122_22u", Simulation PortMap=(1:1),(2:2)
L6 L7 L8: library part 74477530, Case/Size Code=7850, DC Resistance=2.78Ω, DC Resistance Max=3.3Ω, Inductance=1000µH, Manufacturer="Wurth Elektronik", Operating Temperature Max=125°C, Operating Temperature Min=-40°C, Rated Current=0.3A, Self Resonant Frequency=2.4MHz, Category="Unshielded Power Inductors", ComponentLink1Description="Website Link", ComponentLink1URL=https://www.we-online.com/redexpert/article/74477530?ad, ComponentLink2Description="Datasheet Link", ComponentLink2URL=https://www.we-online.com/redexpert/spec/74477530?ad, Height=4.95mm, Length=7.8mm, Manufacturer Part Number=74477530, Match Code=WE-PD2, Mount="Surface Mount", Packaging="Tape and Reel", Saturation Current=0.3A, Width=7mm, Simulation ModelName=7850_74477530_1m, Simulation ModelText=".subckt 7850_74477530_1m 1 2 / Rp 1 2 187304.915771 / Cp 1 2 4.36976277949p / Rs 1 N3 3.3 / L1 N3 2 1000u / .ends 7850_74477530_1m", Simulation PortMap=(1:1),(2:2)
P1: "WR-TBL Series 3055 PCB Header Horizontal Entry with Plastic Latches, THT, pitch 5.08mm, 2p", Manufacturer="Wurth Elektronik", Operating Temperature Max=105°C, Operating Temperature Min=-40°C, Rated Current=16A, Working Voltage=300V, Application=Pluggable, Category="Terminal Blocks", ComponentLink1Description="Website Link", ComponentLink1URL=https://www.we-online.com/redexpert/article/691305540002?ad, ComponentLink2Description="Datasheet Link", ComponentLink2URL=https://www.we-online.com/redexpert/spec/691305540002?ad, Manufacturer Part Number=691305540002, Match Code=WR-TBL, Modularity=No, Mount="Through Hole", Number of Pins=2, Number of Rows=1, Orientation=Horizontal, Packaging=Box, Pitch=5.08mm
R1 R2 R3 R4 R6 R7 R8 R9 R10 R11 R12 R13 R14 R15 R16 R17 R18 R19 R20 R21 R22 R23 R24 R25 R26 R27 R28 R29 R30 R31 R32 R33 R34 R35 R36 R37 R38 R39 R40 R41 R42 R43 R44 R45 R46 R47 R48 R49 R50 R51 R52 R53 R54 R55 R56 R57 R58 R59 R60 R61 R62 R63 R64 R65 R66 R67 R68 R69 R70 R71 R72 R73 R74 R75 R76 R77 R78 R79 R80 R81: library part RES-CONST
R5: library part RES-CONST, "100W RX24 Aluminum Power Metal Shell Case Wirewound Resistor 100Omh"
TP1 TP2 TP3 TP4 TP5 TP6 TP7 TP8 TP9 TP10 TP11 TP12 TP13 TP14 TP15 TP16 TP17 TP18 TP19 TP20 TP21: library part TP_PCB?, "Test_Point"
U15 U17: library part AMC1311
U24: library part LM2576D2T-005G
U26 U28 U29 U30: library part AMS1117

## Via types
v1: diameter 0.6, hole 0.25, Top Layer 1 to Bottom Layer 1, tented both sides, 8 vias
v2: diameter 1.27, hole 0.711, Top Layer 1 to Bottom Layer 1, 5 vias

## Nets (pads, with @x,y where several pads share a name; then routed paths per layer and width w, separated by ;. In a path a pad name is that pad's centre, name@x,y a point inside that pad or via, vN(x,y) a via of type N, cw(c..) or ccw(c..) an arc to the next point about the centre after c; other vN are vias at no path point)
+3V3: C40.2 C41.2 C44.2 C45.2 C86.2 C89.1 U8.20 U14.5 U15.8 U16.5 U17.8 U26.2
+3V3_MCU: C93.1 C96.2 L6.1 U28.2
+3V3_REF: C94.1 C95.2 L6.2
+5: C88.2 C92.2 C98.2 C100.1 L7.2 U26.3 U28.3
+5V: C33.2 C36.2 C38.2 C39.2 U11.2 U12.2
+5V_1: C104.1 C105.2 L8.2
+8VDC: C80.2 C97.1 C102.2 C103.1 C108.2 L5.2 U29.3 U30.3 | length 24.7
  Top Layer 1 w1: L5.2@13.893,111.887 13.893,117.398 16.514,120.019 U29.3@16.514,135.543
+12: C4.2 C12.2 C21.2 C23.2 C27.2 C29.2 C43.2 C47.2 C61.2 C63.2 C67.2 C69.2 C73.2 C76.2 C84.2 C87.2 U2.1 U6.1 U9.1 U13.1 U19.1 U21.1 U23.1 U27.1 | length 28.7
  Bottom Layer 1 w0.5: C69.2@102.856,99.545 C67.2@104.888,99.545 106.397,99.545 U6.1@106.794,99.148 ; U23.1@110.109,300.624 110.506,300.227 C84.2@112.014,300.227 C87.2@114.046,300.227 ; C63.2@146.558,99.584 C61.2@148.59,99.584 150.098,99.584 U13.1@150.495,99.187 ; U19.1@153.797,299.608 154.194,299.211 C73.2@155.702,299.211 C76.2@157.734,299.211 ; U9.1@194.183,299.499 194.58,299.102 C43.2@196.088,299.102 C47.2@198.12,299.102 ; C21.2@231.734,99.947 C12.2@233.766,99.947 235.274,99.947 U27.1@235.671,99.55 ; U2.1@238.506,299.466 238.903,299.069 C23.2@240.411,299.069 C27.2@242.443,299.069